# Altium PCB NB3000XN.PcbDoc (part 64 of 71)
Units mil, origin at the board's own origin, x right, y up, seen from the top; angles counter-clockwise.
Board outline 9527.56 x 6929.77 mil, 6 copper layers (Top Layer, GND+SHIELD, MidLayer1, MidLayer2, P2 - 3V3+5V0, Bottom Layer), stack 62.375 mil thick; 832 components, 1027 nets, 4655 pads, 4981 vias.
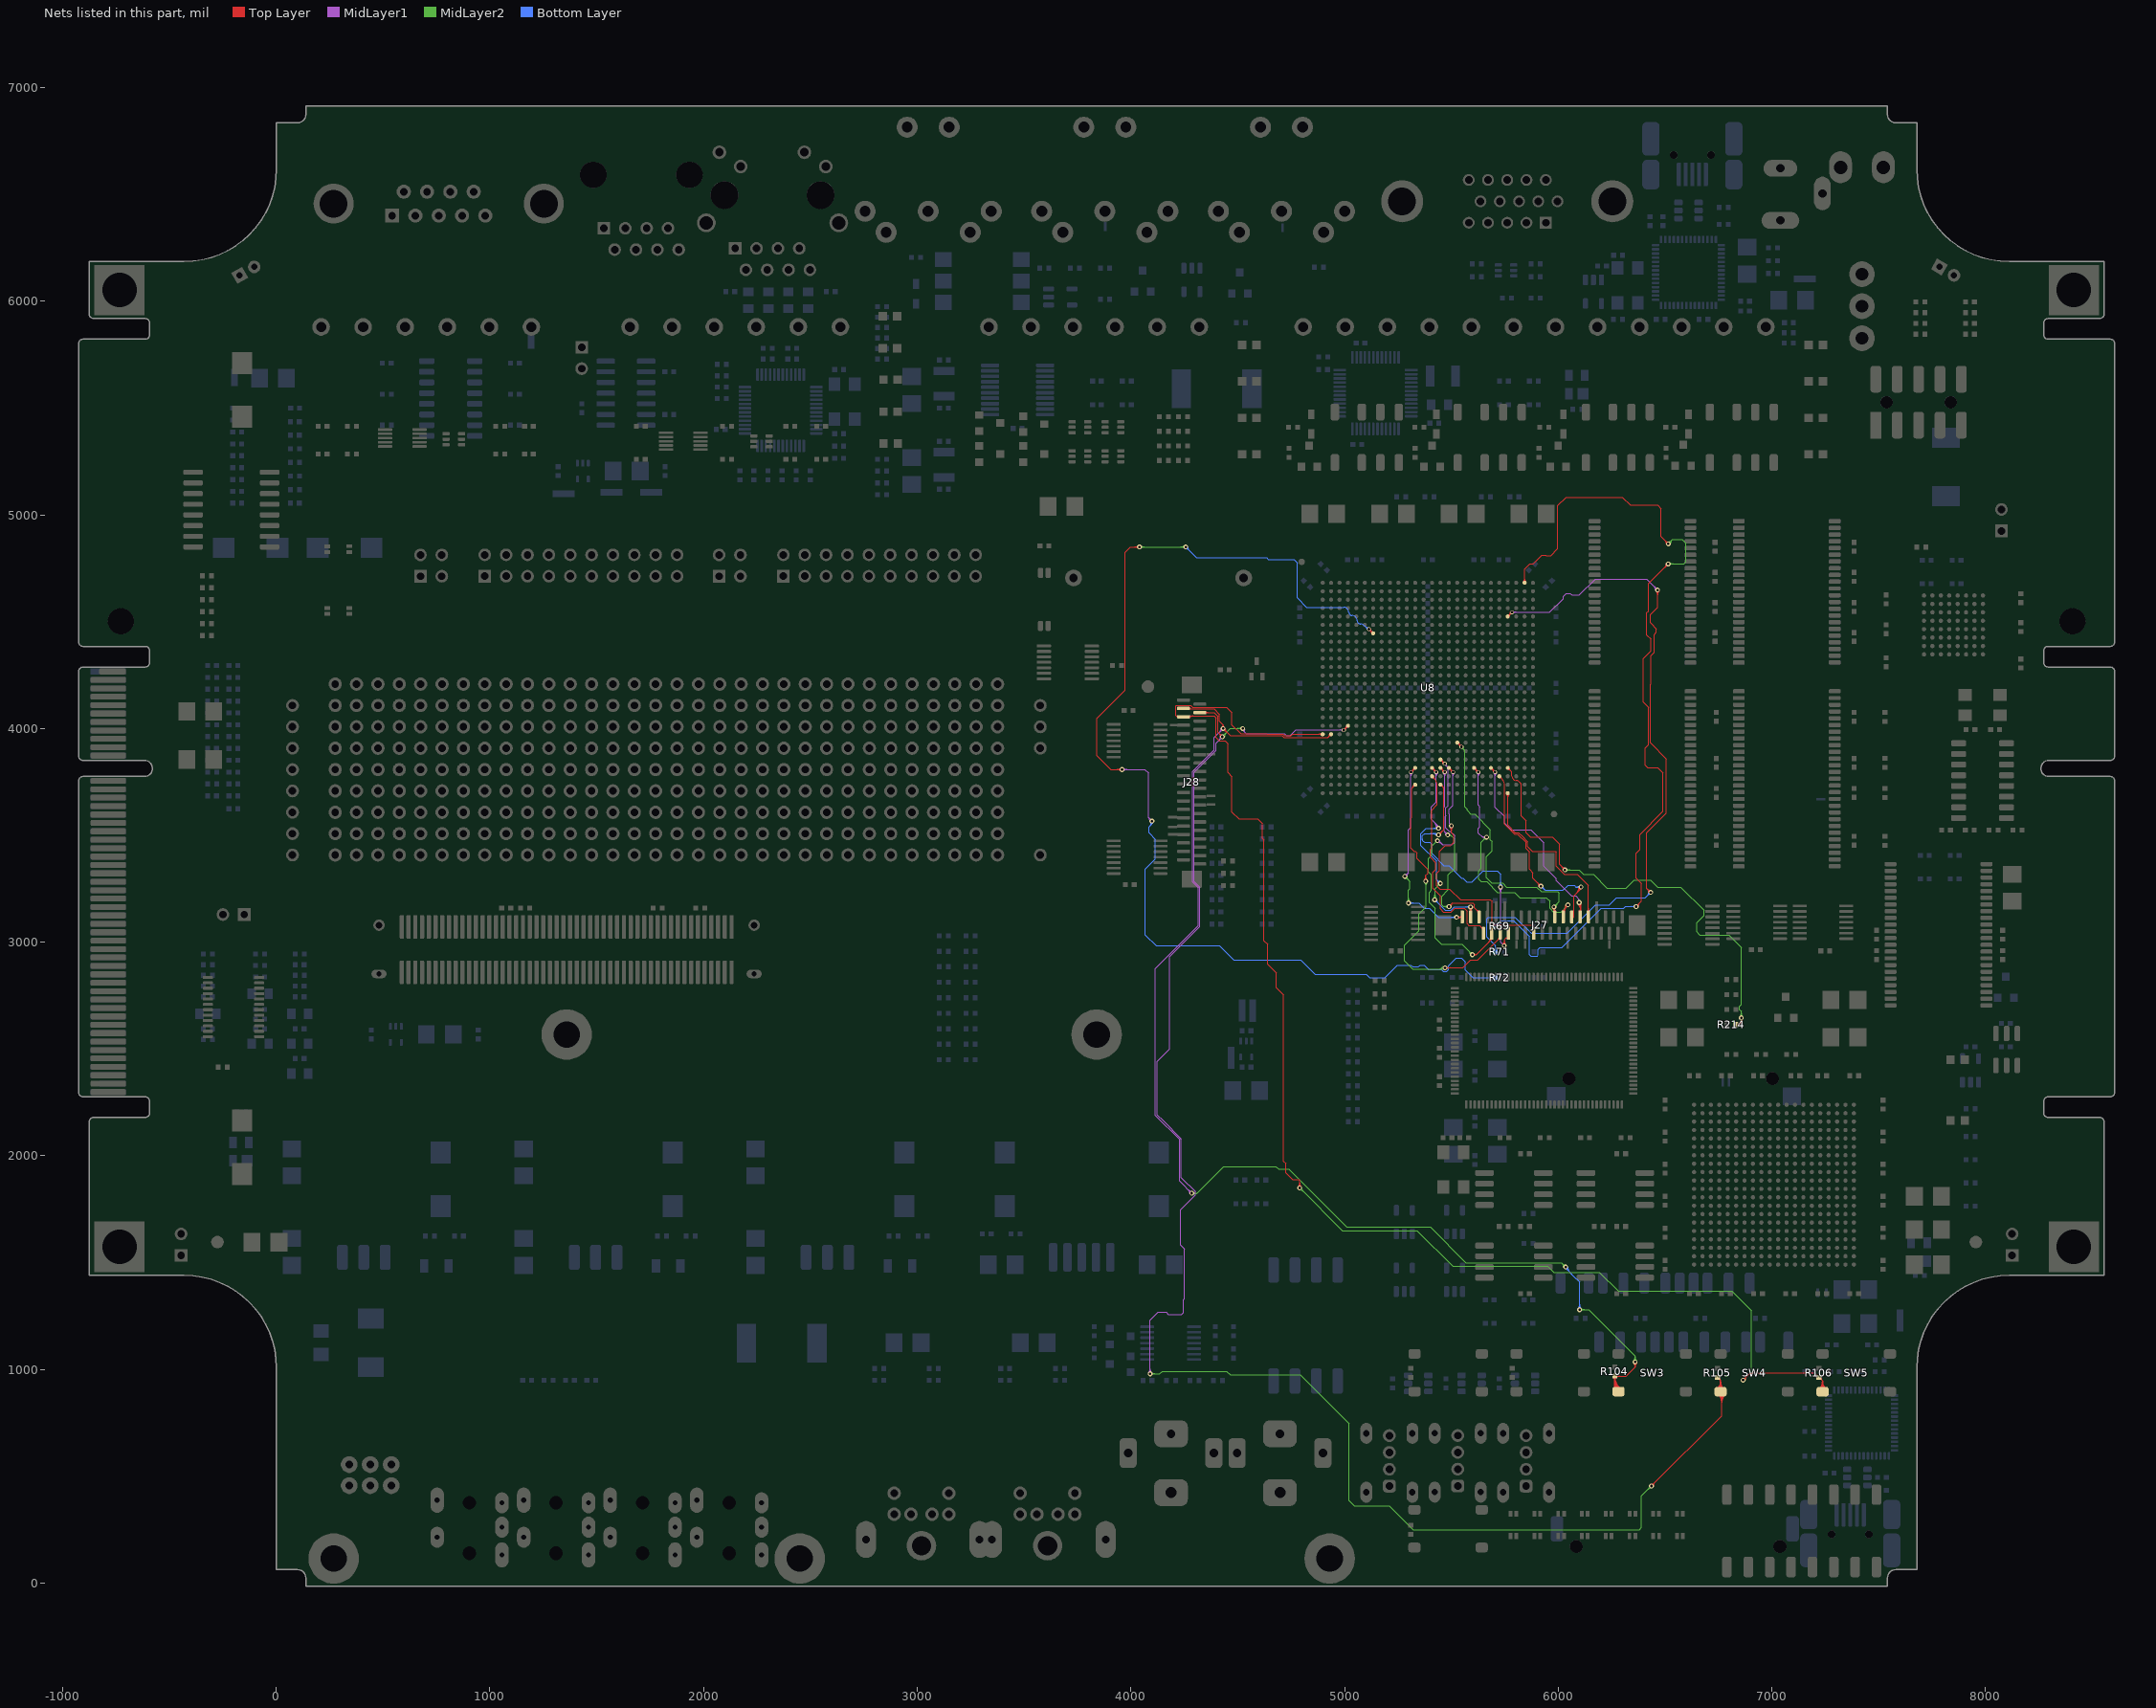
[diagram p68: the nets of this part, all layers, seen from the top]

## Via types
v1: diameter 23, hole 11.81, Top Layer to Bottom Layer, 3672 vias
v2: diameter 26, hole 11.81, Top Layer to Bottom Layer, 461 vias
v3: diameter 19, hole 11.81, Top Layer to Bottom Layer, tented both sides, 396 vias
v4: diameter 23.62, hole 11.81, Top Layer to Bottom Layer, 288 vias
v5: diameter 20, hole 11.81, Top Layer to Bottom Layer, 91 vias
v6: diameter 23, hole 11.81, Top Layer to Bottom Layer, tented both sides, 50 vias
v7: diameter 31, hole 11.81, Top Layer to Bottom Layer, 15 vias
v8: diameter 27.56, hole 11.81, Top Layer to Bottom Layer, tented both sides, 4 vias
v9: diameter 29, hole 11.81, Top Layer to Bottom Layer, 3 vias
v10: diameter 21, hole 11.81, Top Layer to Bottom Layer, 1 vias

## Nets (pads, with @x,y where several pads share a name; then routed paths per layer and width w, separated by ;. In a path a pad name is that pad's centre, name@x,y a point inside that pad or via, vN(x,y) a via of type N, cw(c..) or ccw(c..) an arc to the next point about the centre after c; other vN are vias at no path point) (continued)
SW#.D2: J28.3 R104.1 SW3.2 U8.W2 | length 7158.2
  Top Layer w4: J28.3@4246.61,4094.49 4248.52,4094.49 4251.3,4091.71 4390.19,4091.71 4415.19,4066.71 4415.19,4033.37 4431.86,4016.71 ; J28.3@4270.07,4095.81 ccw(c4279.98,4105.72) 4279.98,4091.71 ; J28.3@4272.89,4090.33 cw(c4276.21,4087.02) J28.3@4276.21,4091.71 ; J28.3@4272.89,4098.64 ccw(c4289.63,4115.38) 4289.63,4091.71 ; v1@4427.02,4008.22 ccw(c4421.99,4016.71) 4431.86,4016.71 ; v1@4431.86,3990.54 cw(c4431.86,3967.61) 4448.07,3983.82 cw(c4464.29,4000.04) v1@4441.36,4000.04 ; v1@4431.86,3994.54 cw(c4431.86,3981.26) 4441.25,3990.65 cw(c4450.64,4000.04) v1@4437.36,4000.04 ; v1@4436.7,4008.22 cw(c4441.73,4016.71) 4431.86,4016.71 ; U8.W2@4929.9,3973.46 cw(c4912.17,3973.46) 4924.71,3960.93 ; U8.W2@4937.24,3966.12 ccw(c4937.24,3948.4) 4924.71,3960.93 ; R104.1@6258.41,962.23 cw(c6242.5,946.32) 6265,946.32 cw(c6287.5,946.32) R104.1@6271.59,962.23 ; R104.1@6261.24,965.06 cw(c6252.16,955.98) 6265,955.98 cw(c6277.84,955.98) R104.1@6268.76,965.06 ; SW3.2@6262.02,911.31 ccw(c6254.84,918.49) SW3.2@6265,918.49 ; 6265,923.84 ccw(c6300.9,923.84) SW3.2@6276.85,897.18 ; 6265,932.83 ccw(c6309.01,932.83) SW3.2@6279.53,900.15 ; 6265,941.83 ccw(c6317.13,941.83) SW3.2@6282.21,903.12 ; 6265,950.82 ccw(c6325.24,950.82) SW3.2@6284.89,906.09 ; R104.1@6265,959.82 ccw(c6333.35,959.82) SW3.2@6287.57,909.06 ; R104.1@6269.25,965.06 cw(c6278.33,955.98) 6278.33,968.82 cw(c6278.33,981.66) R104.1@6269.25,972.58 ; R104.1@6272.08,962.23 cw(c6287.99,946.32) 6287.99,968.82 cw(c6287.99,991.32) R104.1@6272.08,975.41 ; SW3.2@6282.52,896.81 6265,914.33 R104.1@6265,968.82 ; SW3.2@6290.25,912.03 cw(c6341.47,968.81) R104.1@6265,968.82 ; v1@6353.19,1028.28 cw(c6336.97,1012.06) 6359.9,1012.06 cw(c6382.84,1012.06) v1@6366.62,1028.28 ; v1@6356.01,1031.11 cw(c6346.62,1021.72) 6359.9,1021.72 cw(c6373.18,1021.72) v1@6363.79,1031.11 ; v1(6359.9,1035) 6359.9,1010.93 6317.79,968.82 R104.1@6265,968.82 ; 4431.86,4016.71 v1(4431.86,4000.04) 4465.19,3966.71 4708.29,3966.71 4717.04,3957.96 ; 4717.04,3957.96 4796,3957.96 ; 4717.04,3957.96 4780,3957.96 4796,3957.96 ; 4796,3957.96 4855.26,3957.96 4860,3957.96 4870,3957.96 4917.53,3957.96 ccw(c4917.53,3968.11) 4924.71,3960.93
  MidLayer1 w4: v1@4275.5,1825 ccw(c4252.56,1825) 4268.78,1841.22 ccw(c4285,1857.43) v1@4285,1834.5 ; v1@4279.5,1825 ccw(c4266.22,1825) 4275.61,1834.39 ccw(c4285,1843.78) v1@4285,1830.5 ; v1(4285,1825) 4228,1882 4228,2076.69 4115.19,2189.5 4115.19,2877.67 4315.19,3077.67 4315.19,3255 4288.52,3281.67 4288.52,3798.71 4390.19,3900.37 4390.19,3958.37 v1(4431.86,4000.04) ; v1@4422.36,4000.04 cw(c4399.42,4000.04) 4415.64,3983.82 cw(c4431.86,3967.61) v1@4431.86,3990.54 ; v1@4426.36,4000.04 cw(c4413.08,4000.04) 4422.47,3990.65 cw(c4431.86,3981.26) v1@4431.86,3994.54
  MidLayer2 w4: v1@4285,1827.15 v1(4285,1825) 4310,1825 4435.04,1950.04 4678.29,1950.04 4691.15,1937.19 4739.36,1937.19 5009.84,1666.71 5401.5,1666.71 5568.17,1500.04 6014.96,1500.04 v4(6035,1480) ; v1@4288.89,1821.11 cw(c4298.28,1811.72) 4298.28,1825 cw(c4298.28,1838.28) v1@4288.89,1828.89 ; v1@4291.72,1818.28 cw(c4307.93,1802.06) 4307.93,1825 cw(c4307.93,1847.93) v1@4291.72,1831.72 ; v4@6025.19,1480 ccw(c6001.5,1480) 6018.25,1496.75 ccw(c6035,1513.5) v4@6035,1489.81 ; v4@6029.19,1480 ccw(c6015.16,1480) 6025.08,1489.92 ccw(c6035,1499.84) v4@6035,1485.81 ; v4(6100,1280) 6143.56,1280 6359.9,1063.66 v1(6359.9,1035) ; v4@6104.11,1275.89 cw(c6114.03,1265.97) 6114.03,1280 cw(c6114.03,1294.03) v4@6104.11,1284.11 ; v4@6106.94,1273.06 cw(c6123.69,1256.31) 6123.69,1280 cw(c6123.69,1303.69) v4@6106.94,1286.94 ; v1@6353.19,1041.72 ccw(c6336.97,1057.93) 6359.9,1057.93 ccw(c6382.84,1057.93) v1@6366.62,1041.72 ; v1@6356.01,1038.89 ccw(c6346.62,1048.28) 6359.9,1048.28 ccw(c6373.18,1048.28) v1@6363.79,1038.89
  Bottom Layer w4: v4@6035,1470.19 cw(c6035,1458.57) 6043.21,1466.79 ; v4(6035,1480) 6040,1480 6040,1470 6070,1440 ; v4@6036.81,1480 ccw(c6053.25,1480) 6041.63,1468.37 ; v4@6040.81,1480 ccw(c6066.91,1480) 6048.46,1461.54 ; v4@6044.81,1480 ccw(c6080.57,1480) 6055.28,1454.72 ; 6055,1455 6070,1440 ; v4@6093.06,1286.94 ccw(c6076.31,1303.69) 6100,1303.69 ccw(c6123.69,1303.69) v4@6106.94,1286.94 ; v4@6095.89,1284.11 ccw(c6085.97,1294.03) 6100,1294.03 ccw(c6114.03,1294.03) v4@6104.11,1284.11 ; v4(6100,1280) 6100,1410 6070,1440
SW#.D3: J28.4 R105.2 SW4.2 U8.V4 | length 9059.8
  Top Layer w4: J28.4@4331.86,4074.8 J28.4@4323.39,4074.8 4389.09,4074.8 4406.86,4057.04 4406.86,3983.37 v1(4428.52,3961.71) ; J28.4@4349.67,4070.65 cw(c4359.69,4060.62) 4359.69,4074.8 cw(c4359.69,4088.98) J28.4@4349.67,4078.96 ; v1@4419.02,3961.71 ccw(c4396.09,3961.71) 4412.31,3977.93 ccw(c4428.52,3994.14) v1@4428.52,3971.21 ; v1@4423.02,3961.71 ccw(c4409.75,3961.71) 4419.14,3971.1 ccw(c4428.52,3980.49) v1@4428.52,3967.21 ; v3(4996.3,3993.15) U8.V4@5015.98,4012.83 ; v3@5003.8,3993.15 cw(c5021.91,3993.15) 5009.1,4005.95 ; v3@5003.8,3993.15 cw(c5021.91,3993.15) 5009.1,4005.95 ; U8.V4@5008.48,4012.83 cw(c4990.38,4012.83) 5003.18,4000.03 cw(c5015.98,3987.23) U8.V4@5015.98,4005.33 ; U8.V4@5008.64,4012.83 cw(c4990.92,4012.83) 5003.45,4000.3 cw(c5015.98,3987.77) U8.V4@5015.98,4005.49 ; v1(6436.52,454.71) 6765.19,783.37 6765.19,891.25 SW4.2@6760.02,896.42 6760.02,948.8 R105.2@6745,963.82 ; v1@6436.52,460.21 ccw(c6436.52,473.49) 6445.91,464.1 ccw(c6455.3,454.71) v1@6442.02,454.71 ; v1@6436.52,464.21 ccw(c6436.52,487.14) 6452.74,470.93 ccw(c6468.96,454.71) v1@6446.02,454.71 ; SW4.2@6745.52,910.91 ccw(c6710.53,945.91) 6760.02,945.91 ccw(c6809.51,945.91) SW4.2@6774.52,910.91 ; R105.2@6745.69,958.5 cw(c6746.08,948.31) R105.2@6753.3,955.52 ; R105.2@6745.85,954.51 cw(c6746.56,935.83) 6759.77,949.05 cw(c6772.04,961.31) R105.2@6754.77,962.94 ; SW4.2@6748.35,908.08 ccw(c6720.19,936.25) 6760.02,936.25 ccw(c6799.85,936.25) SW4.2@6771.69,908.08 ; R105.2@6750.79,963.32 ccw(c6761.05,962.35) R105.2@6753.76,955.06 ; SW4.2@6751.18,905.26 ccw(c6729.84,926.59) 6760.02,926.59 ccw(c6790.2,926.59) SW4.2@6768.86,905.26 ; SW4.2@6751.52,881.92 cw(c6718.53,848.93) 6765.19,848.93 ; SW4.2@6754.35,884.75 cw(c6728.19,858.59) 6765.19,858.59 ; SW4.2@6757.18,887.58 cw(c6737.84,868.24) 6765.19,868.24 ; 6765.19,844.92 cw(c6817.51,844.92) SW4.2@6780.52,881.92 ; 6765.19,854.58 cw(c6807.86,854.58) SW4.2@6777.69,884.75 ; 6765.19,864.24 cw(c6798.2,864.24) SW4.2@6774.86,887.58 ; 6765.19,873.89 cw(c6788.54,873.89) SW4.2@6772.03,890.41 ; 5009.1,4005.95 cw(c4996.3,4018.76) 4996.3,4000.65 ccw(c4996.3,4018.76) 5009.1,4005.95
  MidLayer1 w4: v1@4083.28,986.72 ccw(c4067.06,1002.93) 4090,1002.93 ccw(c4112.93,1002.93) v1@4096.72,986.72 ; v1@4086.11,983.89 ccw(c4076.72,993.28) 4090,993.28 ccw(c4103.28,993.28) v1@4093.89,983.89 ; v1(4090,980) 4090,1230 4127.63,1267.63 4165,1267.63 4174.59,1258.04 4236.73,1258.04 4246,1267.31 4246,1327.31 4249.86,1331.17 4249.86,1565.02 4232.02,1582.85 4232.02,1747.28 4302.5,1817.75 4302.5,1832.25 4236,1898.75 4236,2080 4150,2166 4124.19,2191.81 4124.19,2442.98 4181.86,2500.65 4181.86,2933.02 4323.52,3074.69 4323.52,3257.98 4296.52,3284.98 4296.52,3795.39 4398.52,3897.39 4398.52,3931.71 v1(4428.52,3961.71) ; v1@4419.02,3961.71 cw(c4396.09,3961.71) 4412.31,3945.49 cw(c4428.52,3929.27) v1@4428.52,3952.21 ; v1@4423.02,3961.71 cw(c4409.75,3961.71) 4419.14,3952.32 cw(c4428.52,3942.93) v1@4428.52,3956.21 ; v1(4523.52,4000.04) 4523.52,3991.71 4540.19,3975.04 4718.52,3975.04 4726.86,3966.71 4746.06,3966.71 4772.5,3993.15 4860,3993.15 4870,3993.15 4918.62,3993.15 v3(4996.3,3993.15) ; v1@4524.92,3999.5 ccw(c4535.04,3995.55) 4527.36,3987.87 ; v1@4528.65,3998.04 ccw(c4541.28,3993.12) 4531.69,3983.54 ; v1@4532.38,3996.59 ccw(c4547.51,3990.69) 4536.02,3979.21 ; v3@4991,3987.85 ccw(c4978.19,3975.04) 4978.19,3993.15 ccw(c4978.19,4011.26) v3@4991,3998.45 ; v3@4991.11,3987.96 ccw(c4978.57,3975.42) 4978.57,3993.15 ccw(c4978.57,4010.88) v3@4991.11,3998.34
  MidLayer2 w4: v1(4090,980) 4135,980 4147.04,992.04 4447.96,992.04 4465,975 4793.69,975 5022,746.69 5022,386.11 5046.11,362 5208.94,362 5320.9,250.04 6200,250.04 ; v1@4093.89,976.11 cw(c4103.28,966.72) 4103.28,980 cw(c4103.28,993.28) v1@4093.89,983.89 ; v1@4096.72,973.28 cw(c4112.93,957.06) 4112.93,980 cw(c4112.93,1002.93) v1@4096.72,986.72 ; v1(4428.52,3961.71) 4466.86,4000.04 v1(4523.52,4000.04) ; v1@4428.52,3967.21 ccw(c4428.52,3980.49) 4437.91,3971.1 ccw(c4447.3,3961.71) v1@4434.02,3961.71 ; v1@4428.52,3971.21 ccw(c4428.52,3994.14) 4444.74,3977.93 ccw(c4460.96,3961.71) v1@4438.02,3961.71 ; v1@4516.81,3993.32 ccw(c4500.59,3977.11) 4500.59,4000.04 ccw(c4500.59,4022.98) v1@4516.81,4006.76 ; v1@4519.64,3996.15 ccw(c4510.25,3986.76) 4510.25,4000.04 ccw(c4510.25,4013.32) v1@4519.64,4003.93 ; 6200.33,249.71 6379.71,249.71 6390,260 6390,408.18 v1(6436.52,454.71) ; v1@6427.02,454.71 cw(c6404.09,454.71) 6420.31,438.49 cw(c6436.52,422.27) v1@6436.52,445.21 ; v1@6431.02,454.71 cw(c6417.75,454.71) 6427.14,445.32 cw(c6436.52,435.93) v1@6436.52,449.21
SW#.D4: J28.5 R106.1 SW5.2 U8.W1 | length 7278.1
  Top Layer w4: J28.5@4218.88,4053.38 ccw(c4216.52,4052.66) 4216.52,4055.12 ; J28.5@4218.88,4056.85 cw(c4216.52,4057.58) 4216.52,4055.12 ; J28.5@4270.07,4053.79 cw(c4281.13,4042.73) 4281.13,4058.37 ; J28.5@4272.89,4050.96 cw(c4290.78,4033.08) 4290.78,4058.37 ; v1@4783.47,1856.76 ccw(c4767.26,1872.98) 4790.19,1872.98 ccw(c4813.13,1872.98) v1@4796.91,1856.76 ; v1@4786.3,1853.93 ccw(c4776.91,1863.32) 4790.19,1863.32 ccw(c4803.47,1863.32) v1@4794.08,1853.93 ; v1(4790.19,1850.04) 4790.19,1885 4785.19,1890 4756.21,1890 4725,1921.21 4725,1965.03 4715.19,1974.84 4715.19,2753.02 4681.86,2786.35 4681.86,2855.39 4640.19,2897.06 4640.19,2989.81 4623.52,3006.48 4623.52,3478.02 4615.19,3486.36 4615.19,3555 4593.48,3576.71 4506.76,3576.71 4473.52,3609.94 4473.52,3775.65 4453.86,3795.32 4453.86,3928.04 4440.19,3941.71 4415.19,3941.71 4398.52,3958.37 4398.52,4050.04 4390.19,4058.37 4261.37,4058.37 J28.5@4256.86,4053.86 ; U8.W1@4892.57,3968.16 ccw(c4879.77,3955.36) 4879.77,3973.46 ccw(c4879.77,3991.57) U8.W1@4892.57,3978.77 ; U8.W1@4892.68,3968.27 ccw(c4880.15,3955.74) 4880.15,3973.46 ccw(c4880.15,3991.19) U8.W1@4892.68,3978.66 ; U8.W1@4897.87,3973.46 4870,3973.46 4860,3973.46 4756.76,3973.46 4750,3966.71 4719.61,3966.71 4711.31,3975 4635,3975 4515.19,3975.04 4473.52,4016.71 4473.52,4075.04 4448.52,4100.04 4288.86,4100.04 4280.52,4108.37 4213.52,4108.37 4210.52,4105.37 4210.52,4061.12 4216.52,4055.12 ; v1(6865.19,950.04) 6900.15,985 7198.82,985 R106.1@7220,963.82 ; v1@6865.19,955.54 ccw(c6865.19,968.82) 6874.58,959.43 ccw(c6883.97,950.04) v1@6870.69,950.04 ; v1@6865.19,959.54 ccw(c6865.19,982.48) 6881.41,966.26 ccw(c6897.63,950.04) v1@6874.69,950.04 ; 7203.25,980.57 cw(c7186.5,963.82) R106.1@7210.19,963.82 ; 7204.44,979.38 ccw(c7219.51,994.45) R106.1@7219.51,973.14 ; R106.1@7210.08,973.74 cw(c7200.16,963.82) R106.1@7214.19,963.82 ; R106.1@7211.27,972.55 ccw(c7219.51,980.79) R106.1@7219.51,969.14 ; R106.1@7215.19,963.82 R106.1@7220,963.82 ; R106.1@7220.49,954.5 cw(c7220.49,933.19) 7235.56,948.26 ; R106.1@7220.49,958.5 cw(c7220.49,946.85) R106.1@7228.73,955.09 ; SW5.2@7223.02,910.91 ccw(c7188.03,945.91) 7237.52,945.91 ccw(c7287.01,945.91) SW5.2@7252.02,910.91 ; R106.1@7225.81,963.82 ccw(c7239.84,963.82) R106.1@7229.92,953.9 ; SW5.2@7225.85,908.08 ccw(c7197.69,936.25) 7237.52,936.25 ccw(c7277.35,936.25) SW5.2@7249.19,908.08 ; SW5.2@7228.68,905.26 ccw(c7207.34,926.59) 7237.52,926.59 ccw(c7267.7,926.59) SW5.2@7246.36,905.26 ; R106.1@7229.81,963.82 ccw(c7253.5,963.82) 7236.75,947.07 ; SW5.2@7237.52,915 SW5.2@7237.52,896.42 7237.52,946.3 R106.1@7220,963.82 ; 4216.52,4055.12 J28.5@4246.61,4055.12 J28.5@4251.78,4055.12 ; J28.5@4251.78,4055.12 4256.86,4055.12 J28.5@4256.86,4053.86 ; J28.5@4251.78,4055.12 J28.5@4256.86,4050.04 ; J28.5@4256.86,4050.04 4255.04,4051.86 4255.04,4052.04 J28.5@4256.86,4053.86 ; J28.5@4256.86,4050.04 J28.5@4256.86,4053.86
  MidLayer2 w4: v1@4790.19,1840.54 cw(c4790.19,1817.61) 4806.41,1833.82 cw(c4822.63,1850.04) v1@4799.69,1850.04 ; v1@4790.19,1844.54 cw(c4790.19,1831.26) 4799.58,1840.65 cw(c4808.97,1850.04) v1@4795.69,1850.04 ; v1(4790.19,1850.04) 4990.19,1650.04 5340.19,1650.04 5506.86,1483.37 5951.63,1483.37 5980,1455 6193.56,1455 6281.52,1367.04 6812.96,1367.04 6905,1275 6905,989.85 v1(6865.19,950.04) ; v1@6865.19,955.54 ccw(c6865.19,968.82) 6874.58,959.43 ccw(c6883.97,950.04) v1@6870.69,950.04 ; v1@6865.19,959.54 ccw(c6865.19,982.48) 6881.41,966.26 ccw(c6897.63,950.04) v1@6874.69,950.04
TCK: R69.2 U8.A25 | length 4610.3
  Top Layer w4: U8.A25@5837.45,4687.43 ccw(c5824.65,4700.23) 5842.76,4700.23 ccw(c5860.86,4700.23) U8.A25@5848.06,4687.43 ; U8.A25@5837.56,4687.32 ccw(c5825.03,4699.85) 5842.76,4699.85 ccw(c5860.48,4699.85) U8.A25@5847.95,4687.32 ; U8.A25@5842.76,4682.13 5842.76,4710 5842.76,4720 5842.76,4746.65 5867.65,4771.54 5882.75,4771.54 5923.21,4812 5941.94,4812 5944.44,4809.5 5965.56,4809.5 5998.52,4842.46 5998.52,5044.71 6037.19,5083.37 6300.19,5083.37 6337.52,5046.04 6465.19,5046.04 6481.86,5029.37 6481.86,4898.37 v1(6515.52,4864.71) ; v1(6365.19,3166.71) 6390.19,3191.71 6390.19,3275.04 6365.19,3300.04 6365.19,3416.71 6381.86,3433.37 6381.86,3504.37 6490.19,3612.71 6490.19,3791.71 6465.19,3816.71 6418.86,3816.71 6406.86,3828.71 6406.86,3908.37 6423.52,3925.04 6423.52,4098.71 6398.52,4123.71 6398.52,4328.34 6433.52,4363.34 6433.52,4420.04 6415.19,4438.37 6415.19,4541.71 6423.52,4550.04 6423.52,4678.71 v1(6515.19,4770.37) ; v1@6365.19,3172.21 ccw(c6365.19,3185.49) 6374.58,3176.1 ccw(c6383.97,3166.71) v1@6370.69,3166.71 ; v1@6365.19,3176.21 ccw(c6365.19,3199.14) 6381.41,3182.93 ccw(c6397.63,3166.71) v1@6374.69,3166.71 ; v1@6505.69,4770.37 cw(c6482.76,4770.37) 6498.97,4754.16 cw(c6515.19,4737.94) v1@6515.19,4760.87 ; v1@6506.02,4864.71 ccw(c6483.09,4864.71) 6499.31,4880.93 ccw(c6515.52,4897.14) v1@6515.52,4874.21 ; v1@6509.69,4770.37 cw(c6496.41,4770.37) 6505.8,4760.99 cw(c6515.19,4751.6) v1@6515.19,4764.87 ; v1@6510.02,4864.71 ccw(c6496.75,4864.71) 6506.14,4874.1 ccw(c6515.52,4883.49) v1@6515.52,4870.21
  MidLayer2 w4: v1(6515.19,4770.37) 6588.52,4770.37 6598.52,4780.37 6598.52,4866.71 6580.52,4884.71 6535.52,4884.71 v1(6515.52,4864.71) ; v1@6515.52,4870.21 ccw(c6515.52,4883.49) 6524.91,4874.1 ccw(c6534.3,4864.71) v1@6521.02,4864.71 ; v1@6515.52,4874.21 ccw(c6515.52,4897.14) 6531.74,4880.93 ccw(c6547.96,4864.71) v1@6525.02,4864.71 ; v1@6519.08,4766.49 cw(c6528.47,4757.1) 6528.47,4770.37 cw(c6528.47,4783.65) v1@6519.08,4774.26 ; v1@6521.91,4763.66 cw(c6538.13,4747.44) 6538.13,4770.37 cw(c6538.13,4793.31) v1@6521.91,4777.09
  Bottom Layer w4: R69.2@5705.82,3075 5731.19,3100.37 5792.23,3100.37 5865,3027.6 5865,2941.9 5872.52,2934.37 5902.52,2934.37 5906.86,2938.71 5906.86,2966.71 5915.19,2975.04 6017.86,2975.04 6201.19,3158.37 6306.86,3158.37 6315.19,3166.71 v1(6365.19,3166.71) ; R69.2@5705.82,3080.81 ccw(c5705.82,3094.84) R69.2@5715.74,3084.92 ; R69.2@5705.82,3084.81 ccw(c5705.82,3108.5) 5722.57,3091.75 ; R69.2@5711.14,3075.49 cw(c5722.79,3075.49) R69.2@5714.55,3083.73 ; R69.2@5715.14,3075.49 cw(c5736.45,3075.49) 5721.38,3090.56 ; v1@6358.47,3159.99 ccw(c6342.26,3143.77) 6342.26,3166.71 ccw(c6342.26,3189.64) v1@6358.47,3173.43 ; v1@6361.3,3162.82 ccw(c6351.91,3153.43) 6351.91,3166.71 ccw(c6351.91,3179.99) v1@6361.3,3170.6
TDI: R72.2 U8.G7 | length 6027.5
  Top Layer w4: v1@3952.14,3801.66 ccw(c3935.92,3785.44) 3935.92,3808.37 ccw(c3935.92,3831.31) v1@3952.14,3815.09 ; v1@3954.97,3804.49 ccw(c3945.58,3795.1) 3945.58,3808.37 ccw(c3945.58,3821.65) v1@3954.97,3812.26 ; v1(3958.86,3808.37) 3905.52,3808.37 3840.19,3873.71 3840.19,4046.69 3973.52,4180.02 3973.52,4825.04 3998.52,4850.04 v1(4040.19,4850.04) ; v1@4033.47,4843.32 ccw(c4017.26,4827.11) 4017.26,4850.04 ccw(c4017.26,4872.98) v1@4033.47,4856.76 ; v1@4036.3,4846.15 ccw(c4026.91,4836.76) 4026.91,4850.04 ccw(c4026.91,4863.32) v1@4036.3,4853.93 ; v3(5114.41,4465.59) U8.G7@5134.09,4445.91 ; U8.G7@5126.59,4445.91 ccw(c5108.49,4445.91) 5121.29,4458.71 ccw(c5134.09,4471.51) U8.G7@5134.09,4453.41 ; U8.G7@5126.75,4445.91 ccw(c5109.03,4445.91) 5121.56,4458.44 ccw(c5134.09,4470.97) U8.G7@5134.09,4453.25 ; 5127.21,4452.79 ccw(c5114.41,4439.98) 5114.41,4458.09 cw(c5114.41,4439.98) 5127.21,4452.79 ; 5127.21,4452.79 cw(c5140.02,4465.59) 5121.91,4465.59 ccw(c5140.02,4465.59) 5127.21,4452.79
  MidLayer1 w4: v1(3958.86,3808.37) 4065.19,3808.37 4081.86,3791.71 4081.86,3583.37 v1(4098.52,3566.71) ; v1@3962.75,3804.49 cw(c3972.14,3795.1) 3972.14,3808.37 cw(c3972.14,3821.65) v1@3962.75,3812.26 ; v1@3965.57,3801.66 cw(c3981.79,3785.44) 3981.79,3808.37 cw(c3981.79,3831.31) v1@3965.57,3815.09 ; v1@4089.02,3566.71 ccw(c4066.09,3566.71) 4082.31,3582.93 ccw(c4098.52,3599.14) v1@4098.52,3576.21 ; v1@4093.02,3566.71 ccw(c4079.75,3566.71) 4089.14,3576.1 ccw(c4098.52,3585.49) v1@4098.52,3572.21
  MidLayer2 w4: v1(4040.19,4850.04) v1(4256.86,4850.04) ; v1@4044.08,4846.15 cw(c4053.47,4836.76) 4053.47,4850.04 cw(c4053.47,4863.32) v1@4044.08,4853.93 ; v1@4046.91,4843.32 cw(c4063.13,4827.11) 4063.13,4850.04 cw(c4063.13,4872.98) v1@4046.91,4856.76 ; v1@4250.14,4843.32 ccw(c4233.92,4827.11) 4233.92,4850.04 ccw(c4233.92,4872.98) v1@4250.14,4856.76 ; v1@4252.97,4846.15 ccw(c4243.58,4836.76) 4243.58,4850.04 ccw(c4243.58,4863.32) v1@4252.97,4853.93
  Bottom Layer w4: 4091.59,3546.59 ccw(c4084.78,3553.4) v1@4091.7,3560.1 ; 4094.47,3549.47 ccw(c4087.7,3556.23) v1@4094.57,3562.88 ; 4097.34,3552.34 ccw(c4090.62,3559.06) v1@4097.45,3565.66 ; v1(4098.52,3566.71) 4098.52,3553.52 4085,3540 4085,3511.56 4115.19,3481.37 4115.19,3388.71 4068.19,3341.71 4068.19,3033.35 4118.5,2983.04 4415.17,2983.04 4481.17,2917.04 4788,2917.04 4795.21,2917.04 4862.21,2850.04 5100.84,2850.04 5117.84,2833.04 5188.19,2833.04 5248.52,2893.37 5311.15,2893.37 5318.98,2885.54 5346.73,2885.54 5354.57,2893.37 5371.86,2893.37 5391.19,2874.04 5392.73,2872.5 5452.75,2872.5 5462.75,2862.5 5477.25,2862.5 5487.5,2872.75 5487.5,2889.02 5523.52,2925.04 5548.52,2925.04 5565.19,2908.37 5565.19,2870.73 5600.92,2835 R72.2@5705.82,2835 ; 4100.21,3555.21 ccw(c4093.54,3561.88) v1@4100.32,3568.45 ; v1@4256.86,4840.54 cw(c4256.86,4817.61) 4273.07,4833.82 cw(c4289.29,4850.04) v1@4266.36,4850.04 ; v1@4256.86,4844.54 cw(c4256.86,4831.26) 4266.25,4840.65 cw(c4275.64,4850.04) v1@4262.36,4850.04 ; v1(4256.86,4850.04) 4298.52,4808.37 4307.19,4799.71 4635.17,4799.71 4643.17,4791.71 4764,4791.71 4779,4776.71 4779,4611 4821.9,4568.1 4860,4568.1 4870,4568.1 4996.3,4568.1 cw(c4996.3,4544.33) 5020.07,4544.33 ccw(c5035.67,4544.33) 5035.67,4528.73 cw(c5035.67,4504.96) 5059.44,4504.96 ccw(c5075.04,4504.96) 5075.04,4489.36 cw(c5075.04,4465.59) 5091.85,4482.4 5099.58,4475.98 ; v3@5107.02,4464.29 ccw(c5089.19,4461.14) 5099.58,4475.98 ; v3@5113.11,4472.98 cw(c5109.96,4490.81) 5099.58,4475.98 ; R72.2@5699.23,2828.41 ccw(c5683.32,2812.5) 5683.32,2835 ccw(c5683.32,2857.5) R72.2@5699.23,2841.59 ; R72.2@5702.06,2831.24 ccw(c5692.98,2822.16) 5692.98,2835 ccw(c5692.98,2847.84) R72.2@5702.06,2838.76 ; R72.2@5705.82,2835 5705.82,2834.51 R72.2@5705.82,2835
TDO: R71.2 U8.E23 | length 3869.6
  Top Layer w4: U8.E23@5764.02,4524.65 v3(5783.7,4544.33) ; U8.E23@5764.02,4531.99 ccw(c5764.02,4549.71) 5776.55,4537.18 ccw(c5789.08,4524.65) U8.E23@5771.36,4524.65 ; U8.E23@5764.02,4532.15 ccw(c5764.02,4550.25) 5776.82,4537.45 ccw(c5789.62,4524.65) U8.E23@5771.52,4524.65 ; v1@6423.69,3233.37 ccw(c6400.76,3233.37) 6416.97,3249.59 ccw(c6433.19,3265.81) v1@6433.19,3242.87 ; v1@6427.69,3233.37 ccw(c6414.41,3233.37) 6423.8,3242.76 ccw(c6433.19,3252.15) v1@6433.19,3238.87 ; v1(6433.19,3233.37) 6415.19,3251.37 6415.19,3513.39 6506.86,3605.06 6506.86,3858.37 6431.86,3933.37 6431.86,4206.37 6433.86,4208.37 6433.86,4341.04 6449.52,4356.71 6449.52,4440 6459.52,4450 6459.52,4467.04 6431.86,4494.71 6431.86,4533.39 6465.19,4566.73 v1(6465.19,4648.71) ; v1@6458.47,4641.99 cw(c6442.26,4625.77) 6465.19,4625.77 cw(c6488.13,4625.77) v1@6471.91,4641.99 ; v1@6461.3,4644.82 cw(c6451.91,4635.43) 6465.19,4635.43 cw(c6478.47,4635.43) v1@6469.08,4644.82 ; 5770.9,4531.53 cw(c5783.7,4518.72) 5783.7,4536.83 ccw(c5783.7,4518.72) 5770.9,4531.53 ; 5770.9,4531.53 ccw(c5758.09,4544.33) 5776.2,4544.33 cw(c5758.09,4544.33) 5770.9,4531.53
  MidLayer1 w4: v3(5783.7,4544.33) 5861.38,4544.33 5910,4544.33 5920,4544.33 5924.74,4544.33 5959.48,4544.33 6023.52,4608.37 6023.52,4618.71 6038.19,4633.37 6056.86,4633.37 6065.19,4625.04 6098.52,4625.04 6173.52,4700.04 6413.86,4700.04 v1(6465.19,4648.71) ; v3@5788.89,4539.14 cw(c5801.43,4526.6) 5801.43,4544.33 cw(c5801.43,4562.06) v3@5788.89,4549.52 ; v1@6455.69,4648.71 ccw(c6432.76,4648.71) 6448.97,4664.93 ccw(c6465.19,4681.14) v1@6465.19,4658.21 ; v1@6459.69,4648.71 ccw(c6446.41,4648.71) 6455.8,4658.1 ccw(c6465.19,4667.49) v1@6465.19,4654.21 ; 5801.81,4544.33 cw(c5801.81,4562.44) 5789,4549.63 ccw(c5801.81,4562.44) 5801.81,4544.33 ; 5801.81,4544.33 ccw(c5801.81,4526.22) 5789,4539.03 cw(c5801.81,4526.22) 5801.81,4544.33
  Bottom Layer w4: R71.2@5699.23,2962.08 ccw(c5683.32,2977.99) 5705.82,2977.99 ccw(c5728.32,2977.99) R71.2@5712.41,2962.08 ; R71.2@5702.06,2959.25 ccw(c5692.98,2968.33) 5705.82,2968.33 ccw(c5718.66,2968.33) R71.2@5709.58,2959.25 ; R71.2@5705.82,2955 5705.82,2984.41 5665.19,3025.04 5665.19,3108.37 5673.52,3116.71 5798.52,3116.71 5873.52,3041.71 6041.88,3041.71 6175.17,3175 6225,3175 6240.19,3175.04 6273.52,3208.37 6408.19,3208.37 v1(6433.19,3233.37) ; v1@6423.69,3233.37 cw(c6400.76,3233.37) 6416.97,3217.16 cw(c6433.19,3200.94) v1@6433.19,3223.87 ; v1@6427.69,3233.37 cw(c6414.41,3233.37) 6423.8,3223.99 cw(c6433.19,3214.6) v1@6433.19,3227.87
TFT_IO.BL: R214.2 U8.AC23 | length 2455.9
  Top Layer w4: v1@6022.36,3338.71 ccw(c5999.42,3338.71) 6015.64,3354.93 ccw(c6031.86,3371.14) v1@6031.86,3348.21 ; v1@6026.36,3338.71 ccw(c6013.08,3338.71) 6022.47,3348.1 ccw(c6031.86,3357.49) v1@6031.86,3344.21 ; v1(6031.86,3338.71) 6006.86,3363.71 6006.86,3458.37 5973.52,3491.71 5917,3491.71 5873.29,3491.71 5869.84,3491.71 5849.02,3512.52 5849.02,3515.98 5849.02,3530 5849.02,3568.94 5827.25,3590.71 5827.25,3660 5827.25,3670 5827.25,3736.73 ccw(c5817.1,3736.73) 5824.28,3743.91 5824.27,3744.13 5816.36,3752.05 ccw(c5803.39,3737.24) 5803.39,3756.93 cw(c5803.39,3776.62) 5783.7,3776.61 5783.7,3788.06 ccw(c5764.02,3788.06) 5777.94,3801.97 5777.94,3802.06 5776.55,3803.45 ; R214.2@6831.18,2615 6831.18,2616.71 6848.52,2616.71 ; R214.2@6838.33,2621.47 ccw(c6848.52,2630) 6848.52,2616.71 ; R214.2@6839.45,2611.2 cw(c6848.52,2606.48) 6848.52,2616.71 ; v1@6850.67,2638.5 cw(c6839.13,2625.04) 6856.86,2625.04 ; v1@6853.28,2641.53 cw(c6846.59,2633.74) 6856.86,2633.74 cw(c6867.12,2633.74) v1@6860.44,2641.53 ; v1(6856.86,2645.71) 6856.86,2625.04 ; v1@6863.04,2638.5 ccw(c6874.58,2625.04) 6856.86,2625.04 ; 5776.55,3803.45 cw(c5789.08,3815.98) 5771.36,3815.98 ccw(c5789.08,3815.98) 5776.55,3803.45 ; 5776.55,3803.45 ccw(c5764.02,3790.92) 5764.02,3808.64 cw(c5764.02,3790.92) 5776.55,3803.45 ; 6848.52,2616.71 6856.86,2625.04
  MidLayer2 w4: v1@6031.86,3330.37 v1(6031.86,3338.71) 6097.54,3338.71 6119.54,3316.71 6166.19,3316.71 6229.1,3253.8 6318.95,3253.8 6356.86,3291.71 6431.86,3291.71 6465.19,3258.37 6573.52,3258.37 6681.86,3150.04 6681.86,3125.04 6648.52,3091.71 6648.52,3048.37 ; v1@6035.75,3334.82 cw(c6045.14,3325.43) 6045.14,3338.71 cw(c6045.14,3351.99) v1@6035.75,3342.6 ; v1@6038.57,3331.99 cw(c6054.79,3315.77) 6054.79,3338.71 cw(c6054.79,3361.64) v1@6038.57,3345.43 ; v1@6850.14,2652.43 ccw(c6833.92,2668.64) 6856.86,2668.64 ccw(c6879.79,2668.64) v1@6863.57,2652.43 ; v1@6852.97,2649.6 ccw(c6843.58,2658.99) 6856.86,2658.99 ccw(c6870.14,2658.99) v1@6860.75,2649.6 ; v1(6856.86,2645.71) 6856.86,2676.67 6848.52,2685 6848.52,2700.04 6856.86,2708.37 6856.86,2975.04 6798.52,3033.37 6663.52,3033.37 6656.86,3040.04 ; 6648.52,3048.37 6656.86,3040.04 ; 6648.52,3048.37 6656.86,3040.04
TFT_IO.CS: J27.22 U8.AC16 | length 1507.4
  Top Layer w4: U8.AC16@5488.43,3808.48 cw(c5488.43,3790.38) 5501.23,3803.18 cw(c5514.03,3815.98) U8.AC16@5495.93,3815.98 ; U8.AC16@5488.43,3808.64 cw(c5488.43,3790.92) 5500.96,3803.45 cw(c5513.49,3815.98) U8.AC16@5495.77,3815.98 ; U8.AC16@5488.43,3815.98 v3(5508.11,3796.3) ; v1@5493.28,3538.28 cw(c5476.7,3521.7) 5500.15,3521.7 ; v1@5496.11,3541.11 cw(c5486.36,3531.36) 5500.15,3531.36 ; v1(5500,3545) 5500.15,3545 5500.15,3511.87 5512.02,3500 5512.02,3467.79 5496.11,3451.87 5471.87,3451.87 5444.31,3424.31 5444.31,3335.33 5431.02,3322.04 5431.02,3263.98 5445.91,3249.09 5492.39,3249.09 5542.28,3199.21 5682.69,3199.21 5690.19,3191.71 5690.19,3089.04 5698.52,3080.71 5876.19,3080.71 5890.19,3066.71 5890.19,3063.73 5885.9,3063.73 J27.22@5885.89,3041.61 ; 5500.15,3522.43 cw(c5522.57,3522.43) v1@5506.72,3538.28 ; 5500.15,3532.08 cw(c5512.92,3532.08) v1@5503.89,3541.11 ; 5878.72,3078.18 cw(c5865.8,3065.25) J27.22@5884.02,3063.88 ; 5884.88,3072.01 cw(c5877.26,3064.39) J27.22@5888.01,3063.58 ; 5495.31,3809.1 cw(c5482.5,3796.3) 5500.61,3796.3 ccw(c5482.5,3796.3) 5495.31,3809.1 ; 5495.31,3809.1 ccw(c5508.11,3821.91) 5508.11,3803.8 cw(c5508.11,3821.91) 5495.31,3809.1
  MidLayer1 w4: 5489.5,3599.44 5489.5,3599.88 ; v1(5500,3545) 5500.15,3545 5490.5,3554.65 5490.5,3598.88 5489.5,3599.88 ; v3@5502.81,3791 cw(c5490,3778.19) 5508.11,3778.19 cw(c5526.22,3778.19) v3@5513.41,3791 ; v3@5502.92,3791.11 cw(c5490.38,3778.57) 5508.11,3778.57 cw(c5525.84,3778.57) v3@5513.3,3791.11 ; v3(5508.11,3796.3) 5508.11,3718.62 5508.11,3670 5508.11,3660 5508.11,3640.27 5489.5,3621.66 5489.5,3599.88
TFT_IO.DB0: J27.34 U8.AD14 | length 1037.3
  Top Layer w4: 5407.69,3454.96 5407.69,3440.46 5402,3434.77 5402,3398 5427.5,3372.5 5427.5,3360 5427.5,3346.6 5427.5,3341.14 5414,3327.64 5414,3320 5414,3252.21 5448.52,3217.69 5448.52,3156.37 5463.19,3141.71 5498.52,3141.71 5515.19,3158.37 5561.52,3158.37 5573.52,3146.37 5573.52,3086.04 5581.86,3077.71 5631.86,3077.71 5648.52,3061.04 5648.52,3050.04 5649.67,3050.04 J27.34@5649.67,3041.61 ; 5407.7,3440.47 5407.7,3618.89 5433.55,3644.73 5433.55,3660 5433.55,3670 5433.55,3736.73 ccw(c5394.87,3736.73) 5422.22,3764.08 ; U8.AD14@5409.69,3769.27 cw(c5409.69,3751.55) 5422.22,3764.08 ; U8.AD14@5417.03,3776.61 ccw(c5434.75,3776.61) 5422.22,3764.08 ; 5633.78,3075.78 ccw(c5648.72,3090.72) J27.34@5649.46,3069.61 ; 5640.28,3069.28 ccw(c5649.16,3078.16) J27.34@5649.6,3065.61 ; J27.34@5642.36,3067.2 cw(c5638.9,3063.74) J27.34@5643.8,3063.74
TFT_IO.DB1: J27.32 U8.AB15 | length 1707.5
  Top Layer w4: U8.AB15@5449.06,3847.85 cw(c5449.06,3829.75) 5461.86,3842.55 cw(c5474.66,3855.35) U8.AB15@5456.56,3855.35 ; U8.AB15@5449.06,3848.01 cw(c5449.06,3830.29) 5461.59,3842.82 cw(c5474.12,3855.35) U8.AB15@5456.4,3855.35 ; U8.AB15@5449.06,3855.35 v3(5468.74,3835.67) ; v1(5598.52,2941.71) 5616.19,2941.71 ; v1@5606.45,2936.47 cw(c5616.19,2930.03) 5616.19,2941.71 ; v1@5606.45,2946.95 ccw(c5616.19,2953.38) 5616.19,2941.71 ; 5675.53,3001.05 ccw(c5657.09,3019.49) J27.32@5683.17,3019.49 ; 5682.36,3007.87 ccw(c5670.74,3019.49) J27.32@5687.17,3019.49 ; J27.32@5689.04,3041.61 5689.04,3019.48 5689.04,3016.71 5689.19,3016.71 5690.19,3015.71 5616.19,2941.71 ; 5455.94,3848.47 cw(c5443.13,3835.67) 5461.24,3835.67 ccw(c5443.13,3835.67) 5455.94,3848.47 ; 5455.94,3848.47 ccw(c5468.74,3861.28) 5468.74,3843.17 cw(c5468.74,3861.28) 5455.94,3848.47
  MidLayer1 w4: v1@5435,3465.5 cw(c5435,3429.93) 5460.15,3455.08 ; v1@5435,3469.5 cw(c5435,3443.59) 5453.32,3461.91 ; v1@5435,3473.5 cw(c5435,3457.25) 5446.49,3468.74 ; v1(5435,3475) 5435,3476.55 5436.46,3478.01 5437.22,3478.01 5459.52,3455.71 5502.52,3455.71 5515.19,3468.37 5515.19,3498.31 5494,3519.5 5489.44,3519.5 5474.5,3534.44 5474.5,3591.81 5473.5,3592.81 5473.5,3628.29 5484.25,3639.04 5484.25,3660 5484.25,3670 5484.25,3718.62 5484.25,3812.16 ; v1@5444.5,3475 ccw(c5454.8,3475) 5447.52,3467.71 ; v3@5468.09,3828.2 cw(c5466.51,3810.16) 5480.38,3821.8 cw(c5494.25,3833.44) v3@5476.21,3835.02 ; 5480.13,3822.09 cw(c5470.2,3812.16) 5484.25,3812.16 ; 5484.25,3798.23 5484.25,3812.16
  MidLayer2 w4: v1(5435,3475) 5435,3476.55 5436.46,3478.01 5437.22,3478.01 5440.19,3475.04 5440.19,3473.37 5437.32,3470.5 5429.44,3470.5 5409.5,3450.56 5409.5,3409.5 5392.5,3392.5 5392.5,3329.36 5406.86,3315 5406.86,3243.71 5396.52,3233.37 5396.52,3185.37 5423.52,3158.37 5423.52,3020 5453.52,2990 5550.23,2990 v1(5598.52,2941.71) ; v1@5589.02,2941.71 ccw(c5566.09,2941.71) 5582.31,2957.93 ccw(c5598.52,2974.14) v1@5598.52,2951.21 ; v1@5593.02,2941.71 ccw(c5579.75,2941.71) 5589.14,2951.1 ccw(c5598.52,2960.49) v1@5598.52,2947.21
TFT_IO.DB2: J27.30 U8.AE12 | length 1752.5
  Top Layer w4: U8.AE12@5323.6,3737.24 cw(c5305.88,3737.24) 5318.41,3724.71 ; U8.AE12@5330.94,3729.9 ccw(c5330.94,3712.17) 5318.41,3724.71 ; v1@5373.28,3291.72 ccw(c5357.06,3307.93) 5380,3307.93 ccw(c5402.93,3307.93) v1@5386.72,3291.72 ; v1@5376.11,3288.89 ccw(c5366.72,3298.28) 5380,3298.28 ccw(c5393.28,3298.28) v1@5383.89,3288.89 ; v1@5381.86,3283.37 5380.23,3285 v1(5380,3285) 5380,3312.87 5390,3322.87 5390,3340.9 5340.19,3390.71 5340.19,3416.71 5331.86,3425.04 5325.86,3425.04 5309.19,3441.71 5309.19,3579 5315.19,3585 5315.44,3585.25 5315.44,3655.26 5315.44,3660 5315.44,3670 5315.44,3717.53 cw(c5325.59,3717.53) 5318.41,3724.71 ; v1(5470,2880) 5553.15,2880 5589.86,2916.71 5623.52,2916.71 5723.52,3016.71 5723.52,3033.37 5728.41,3033.37 J27.30@5728.41,3041.61 ; v1@5473.89,2876.11 cw(c5483.28,2866.72) 5483.28,2880 cw(c5483.28,2893.28) v1@5473.89,2883.89 ; v1@5476.72,2873.28 cw(c5492.93,2857.06) 5492.93,2880 cw(c5492.93,2902.93) v1@5476.72,2886.72 ; 5714.79,3007.97 cw(c5728.41,2994.35) J27.30@5728.41,3013.61 ; 5719.87,3013.06 ccw(c5713.44,3019.49) J27.30@5722.54,3019.49 ; J27.30@5721.62,3014.8 cw(c5728.41,3008) J27.30@5728.41,3017.61
  MidLayer2 w4: v1@5373.28,3278.28 cw(c5350.57,3255.57) 5382.69,3255.57 ; v1@5376.11,3281.11 cw(c5360.23,3265.23) 5382.69,3265.23 ; v1(5380,3285) 5382.69,3282.31 5382.69,3165 5348.52,3130.83 5348.52,3053.52 5281.02,2986.02 5281.02,2912.66 5319.48,2874.21 5464.21,2874.21 v1(5470,2880) ; 5382.69,3268.56 cw(c5396.44,3268.56) v1@5386.72,3278.28 ; 5433.08,2874.21 ccw(c5433.08,2916.92) v1@5463.28,2886.72 ; 5442.74,2874.21 ccw(c5442.74,2907.26) v1@5466.11,2883.89 ; 5452.4,2874.21 ccw(c5452.4,2897.6) v1@5468.94,2881.06
TFT_IO.DB3: J27.28 U8.AE15 | length 1621.6
  Top Layer w4: v1(5440.19,3502.71) 5464.52,3527.04 5464.52,3658.37 ; v1@5440.19,3508.21 ccw(c5440.19,3521.49) 5449.58,3512.1 ccw(c5458.97,3502.71) v1@5445.69,3502.71 ; v1@5440.19,3512.21 ccw(c5440.19,3535.14) 5456.41,3518.92 ccw(c5472.63,3502.71) v1@5449.69,3502.71 ; U8.AE15@5449.06,3729.9 cw(c5449.06,3712.17) 5461.59,3724.71 ; U8.AE15@5456.4,3737.24 ccw(c5474.12,3737.24) 5461.59,3724.71 ; v1@5740.81,2990.09 ccw(c5722.17,3008.72) 5748.52,3008.72 ; v1@5743.64,2987.26 ccw(c5731.83,2999.07) 5748.52,2999.07 ; v1(5747.52,2983.37) 5748.52,2984.37 5748.52,3011.15 5756.86,3019.48 ; 5748.52,3003.9 ccw(c5768.04,3003.9) v1@5754.24,2990.09 ; J27.28@5762.88,3016.24 ccw(c5756.86,3012.25) 5756.86,3019.48 ; J27.28@5762.88,3022.72 cw(c5756.86,3026.69) 5756.86,3019.48 ; J27.28@5767.78,3041.61 5767.78,3019.48 5756.86,3019.48 ; 5461.59,3724.71 cw(c5454.41,3717.53) 5464.56,3717.53 5464.56,3670 5464.56,3660 5464.56,3658.37 ; 5464.56,3658.37 5464.56,3655.26 5464.56,3658.37
  MidLayer1 w4: v1@5723.47,3251.66 cw(c5707.26,3235.44) 5730.19,3235.44 cw(c5753.13,3235.44) v1@5736.91,3251.66 ; v1@5726.3,3254.49 cw(c5716.91,3245.1) 5730.19,3245.1 cw(c5743.47,3245.1) v1@5734.08,3254.49 ; v1@5731.86,3256.71 v1(5730.19,3258.37) 5730.19,3000.71 5731.86,2999.04 ; 5731.86,2999.04 v1(5747.52,2983.37) 5731.86,2999.04
  Bottom Layer w4: 5403.01,3508.61 cw(c5403.01,3465.52) v1@5433.47,3495.99 ; 5412.66,3508.61 cw(c5412.66,3475.18) v1@5436.3,3498.82 ; 5422.32,3508.61 cw(c5422.32,3484.84) v1@5439.13,3501.65 ; v1(5440.19,3502.71) 5434.29,3508.61 5374.95,3508.61 5364.7,3498.36 5364.7,3483.86 5365.86,3482.71 5365.86,3475.04 5374.19,3466.71 5399.52,3466.71 5407.86,3458.37 5407.86,3415.71 5465.19,3358.37 5490.19,3358.37 5548.52,3300.04 5553.9,3300.04 5571.44,3282.5 5597.25,3282.5 5647.79,3333.04 5715.52,3333.04 5730.19,3318.37 v1(5730.19,3258.37) ; v1@5723.47,3265.09 ccw(c5707.26,3281.31) 5730.19,3281.31 ccw(c5753.13,3281.31) v1@5736.91,3265.09 ; v1@5726.3,3262.26 ccw(c5716.91,3271.65) 5730.19,3271.65 ccw(c5743.47,3271.65) v1@5734.08,3262.26
TFT_IO.DB4: J27.9 U8.AF23 | length 932.1
  Top Layer w4: U8.AF23@5758.71,3692.57 cw(c5745.91,3679.77) 5764.02,3679.77 cw(c5782.12,3679.77) U8.AF23@5769.32,3692.57 ; U8.AF23@5758.82,3692.68 cw(c5746.29,3680.15) 5764.02,3680.15 cw(c5781.74,3680.15) U8.AF23@5769.21,3692.68 ; U8.AF23@5764.02,3697.87 5764.02,3670 5764.02,3660 5764.02,3548.84 5799.28,3513.58 5813.97,3513.58 5831.45,3496.1 5856.86,3470.69 5856.86,3446.71 5878.52,3425.04 5988.52,3425.04 5990.19,3423.37 5990.19,3355.63 6029.11,3316.71 6090.19,3316.71 6140.19,3266.71 6140.19,3140.37 6141.79,3140.37 J27.9@6141.8,3118.39 ; J27.9@6137.64,3144.67 ccw(c6131.5,3150.81) 6140.19,3150.81 ; 6140.19,3148.92 ccw(c6150.2,3148.92) J27.9@6143.12,3141.84 ; 6140.19,3158.57 ccw(c6159.86,3158.57) J27.9@6145.95,3144.67
TFT_IO.DB5: J27.35 U8.AC15 | length 1299.4
  Top Layer w4: U8.AC15@5449.06,3808.48 cw(c5449.06,3790.38) 5461.86,3803.18 cw(c5474.66,3815.98) U8.AC15@5456.56,3815.98 ; U8.AC15@5449.06,3808.64 cw(c5449.06,3790.92) 5461.59,3803.45 cw(c5474.12,3815.98) U8.AC15@5456.4,3815.98 ; U8.AC15@5449.06,3815.98 v3(5468.74,3796.3) ; v1(5489.19,3166.71) 5505.86,3183.37 5535.48,3183.37 5535.65,3183.21 5600.69,3183.21 5608.86,3175.04 5608.86,3161.14 5629.99,3140.01 J27.35@5629.99,3118.39 ; v1@5489.19,3172.21 ccw(c5489.19,3185.49) 5498.58,3176.1 ccw(c5507.97,3166.71) v1@5494.69,3166.71 ; v1@5489.19,3176.21 ccw(c5489.19,3199.14) 5505.41,3182.93 ccw(c5521.63,3166.71) v1@5498.69,3166.71 ; 5619.11,3150.89 ccw(c5629.99,3161.77) J27.35@5629.99,3146.39 ; 5620.31,3149.69 cw(c5611.13,3140.51) J27.35@5624.11,3140.51 ; 5455.94,3809.1 cw(c5443.13,3796.3) 5461.24,3796.3 ccw(c5443.13,3796.3) 5455.94,3809.1 ; 5455.94,3809.1 ccw(c5468.74,3821.91) 5468.74,3803.8 cw(c5468.74,3821.91) 5455.94,3809.1
  MidLayer1 w4: v3@5463.44,3791 cw(c5450.63,3778.19) 5468.74,3778.19 cw(c5486.85,3778.19) v3@5474.04,3791 ; v3@5463.55,3791.11 cw(c5451.01,3778.57) 5468.74,3778.57 cw(c5486.47,3778.57) v3@5473.93,3791.11 ; v3(5468.74,3796.3) 5468.74,3670 5468.74,3660 5468.74,3634.85 5465.5,3631.61 5465.5,3589.5 5466.5,3588.5 5466.5,3518.8 v1(5483.3,3502) ; v1@5473.8,3502 ccw(c5450.86,3502) 5467.08,3518.22 ccw(c5483.3,3534.43) v1@5483.3,3511.5 ; v1@5477.8,3502 ccw(c5464.52,3502) 5473.91,3511.39 ccw(c5483.3,3520.78) v1@5483.3,3507.5
  MidLayer2 w4: v1@5482.47,3159.99 ccw(c5466.26,3143.77) 5466.26,3166.71 ccw(c5466.26,3189.64) v1@5482.47,3173.43 ; v1(5483.3,3502) 5496.88,3502 5516.02,3482.85 5516.02,3345.52 5485.19,3314.69 5485.19,3245.04 5455.86,3215.71 5455.86,3174.14 5463.29,3166.71 v1(5489.19,3166.71) ; v1@5485.3,3162.82 ccw(c5475.91,3153.43) 5475.91,3166.71 ccw(c5475.91,3179.99) v1@5485.3,3170.6
TFT_IO.DB6: J27.37 U8.AC14 | length 1697.7
  Top Layer w4: U8.AC14@5409.69,3808.48 cw(c5409.69,3790.38) 5422.49,3803.18 cw(c5435.29,3815.98) U8.AC14@5417.19,3815.98 ; U8.AC14@5409.69,3808.64 cw(c5409.69,3790.92) 5422.22,3803.45 cw(c5434.75,3815.98) U8.AC14@5417.03,3815.98 ; U8.AC14@5409.69,3815.98 v3(5429.37,3796.3) ; v1@5583.47,3157.99 cw(c5567.26,3141.77) 5590.19,3141.77 cw(c5613.13,3141.77) v1@5596.91,3157.99 ; v1@5586.3,3160.82 cw(c5576.91,3151.43) 5590.19,3151.43 cw(c5603.47,3151.43) v1@5594.08,3160.82 ; J27.37@5586.46,3144.67 ccw(c5577.46,3153.66) v1@5590.19,3153.66 ; v1@5590.19,3155.72 ccw(c5605.83,3155.72) J27.37@5594.77,3144.67 ; v1(5590.19,3164.71) 5590.19,3140.13 5590.62,3140.13 J27.37@5590.62,3118.39 ; 5416.57,3809.1 cw(c5403.76,3796.3) 5421.87,3796.3 ccw(c5403.76,3796.3) 5416.57,3809.1 ; 5416.57,3809.1 ccw(c5429.37,3821.91) 5429.37,3803.8 cw(c5429.37,3821.91) 5416.57,3809.1
  MidLayer1 w4: 5418.08,3563.82 cw(c5387.64,3533.37) v1@5430.69,3533.37 ; v3@5424.18,3791.11 cw(c5411.64,3778.57) 5429.37,3778.57 cw(c5447.1,3778.57) v3@5434.56,3791.11 ; 5424.91,3556.99 cw(c5401.29,3533.37) v1@5434.69,3533.37 ; v3(5429.37,3796.3) 5429.37,3718.62 5429.37,3670 5429.37,3660 5429.37,3655.26 5406.86,3632.75 5406.86,3575.04 5440.19,3541.71 v1(5440.19,3533.37) ; 5431.74,3550.16 cw(c5414.95,3533.37) v1@5438.69,3533.37 ; 5429.37,3778.19 cw(c5447.48,3778.19) 5434.67,3791 ccw(c5447.48,3778.19) 5429.37,3778.19 ; 5429.37,3778.19 ccw(c5411.26,3778.19) 5424.07,3791 cw(c5411.26,3778.19) 5429.37,3778.19
  MidLayer2 w4: v1@5415.47,3205.43 ccw(c5396.03,3224.86) 5423.52,3224.86 ; v1@5418.3,3202.6 ccw(c5405.69,3215.21) 5423.52,3215.21 ; v1(5422.19,3198.71) 5422.19,3207.04 5423.52,3208.37 5423.52,3250.04 v1(5448.52,3275.04) ; 5423.52,3218.42 ccw(c5441.9,3218.42) v1@5428.91,3205.43 ; v1@5439.02,3275.04 cw(c5416.09,3275.04) 5432.31,3258.82 cw(c5448.52,3242.61) v1@5448.52,3265.54 ; v1@5443.02,3275.04 cw(c5429.75,3275.04) 5439.14,3265.65 cw(c5448.52,3256.26) v1@5448.52,3269.54
  Bottom Layer w4: v1@5422.19,3189.21 cw(c5422.19,3166.27) 5438.41,3182.49 cw(c5454.63,3198.71) v1@5431.69,3198.71 ; v1@5422.19,3193.21 cw(c5422.19,3179.93) 5431.58,3189.32 cw(c5440.97,3198.71) v1@5427.69,3198.71 ; v1(5422.19,3198.71) 5471.86,3149.04 5498.52,3149.04 5514.19,3164.71 v1(5590.19,3164.71) ; v1@5433.47,3526.66 ccw(c5417.26,3510.44) 5417.26,3533.37 ccw(c5417.26,3556.31) v1@5433.47,3540.09 ; v1@5436.3,3529.49 ccw(c5426.91,3520.1) 5426.91,3533.37 ccw(c5426.91,3546.65) v1@5436.3,3537.26 ; v1@5439.02,3275.04 ccw(c5416.09,3275.04) 5432.31,3291.26 ccw(c5448.52,3307.48) v1@5448.52,3284.54 ; v1(5440.19,3533.37) 5382.86,3533.37 5357.86,3508.37 5357.86,3502.83 5356.7,3501.67 5356.7,3480.55 5357.86,3479.39 5357.86,3451.71 5430,3379.56 5430,3293.56 v1(5448.52,3275.04) ; v1@5443.02,3275.04 ccw(c5429.75,3275.04) 5439.14,3284.43 ccw(c5448.52,3293.82) v1@5448.52,3280.54 ; v1@5583.47,3157.99 ccw(c5567.26,3141.77) 5567.26,3164.71 ccw(c5567.26,3187.64) v1@5583.47,3171.43 ; v1@5586.3,3160.82 ccw(c5576.91,3151.43) 5576.91,3164.71 ccw(c5576.91,3177.99) v1@5586.3,3168.6
TFT_IO.DB7: J27.39 U8.AC12 | length 1486.9
  Top Layer w4: v3(5311.26,3796.3) U8.AC12@5330.94,3815.98 ; U8.AC12@5323.44,3815.98 cw(c5305.34,3815.98) 5318.14,3803.18 cw(c5330.94,3790.38) U8.AC12@5330.94,3808.48 ; U8.AC12@5323.6,3815.98 cw(c5305.88,3815.98) 5318.41,3803.45 cw(c5330.94,3790.92) U8.AC12@5330.94,3808.64 ; v1(5524.52,3116.71) 5549.57,3116.71 J27.39@5551.25,3118.39 ; v1@5528.41,3112.82 cw(c5537.8,3103.43) 5537.8,3116.71 cw(c5537.8,3129.99) v1@5528.41,3120.6 ; v1@5531.24,3109.99 cw(c5547.46,3093.77) 5547.46,3116.71 cw(c5547.46,3139.64) v1@5531.24,3123.43 ; v1@5533.01,3116.71 ccw(c5533.01,3136.62) J27.39@5547.09,3122.54 ; 5541.12,3116.71 cw(c5541.12,3108.26) J27.39@5547.09,3114.23 ; 5542.67,3116.71 ccw(c5542.67,3126.96) J27.39@5549.92,3119.71 ; 5324.06,3809.1 ccw(c5336.87,3796.3) 5318.76,3796.3 cw(c5336.87,3796.3) 5324.06,3809.1 ; 5324.06,3809.1 cw(c5311.26,3821.91) 5311.26,3803.8 ccw(c5311.26,3821.91) 5324.06,3809.1
  MidLayer1 w4: v1(5281.86,3308.37) 5298.52,3325.04 5298.52,3525.04 5311.26,3537.78 5311.26,3660 5311.26,3670 v3(5311.26,3796.3) ; v1@5281.86,3313.87 ccw(c5281.86,3327.15) 5291.25,3317.76 ccw(c5300.64,3308.37) v1@5287.36,3308.37 ; v1@5281.86,3317.87 ccw(c5281.86,3340.81) 5298.08,3324.59 ccw(c5314.29,3308.37) v1@5291.36,3308.37 ; v3@5305.96,3791 cw(c5293.15,3778.19) 5311.26,3778.19 cw(c5329.37,3778.19) v3@5316.56,3791 ; v3@5306.07,3791.11 cw(c5293.53,3778.57) 5311.26,3778.57 cw(c5328.99,3778.57) v3@5316.45,3791.11
  MidLayer2 w4: v1@5281.86,3298.87 cw(c5281.86,3275.94) 5298.07,3292.16 cw(c5314.29,3308.37) v1@5291.36,3308.37 ; v1@5281.86,3302.87 cw(c5281.86,3289.6) 5291.25,3298.99 cw(c5300.64,3308.37) v1@5287.36,3308.37 ; v1(5281.86,3308.37) 5306.19,3284.04 5306.19,3249.45 5299.52,3242.78 v1(5299.52,3183.37) ; v1@5292.81,3190.09 ccw(c5276.59,3206.31) 5299.52,3206.31 ccw(c5322.46,3206.31) v1@5306.24,3190.09 ; v1@5295.64,3187.26 ccw(c5286.25,3196.65) 5299.52,3196.65 ccw(c5312.8,3196.65) v1@5303.41,3187.26
  Bottom Layer w4: v1(5299.52,3183.37) 5348.52,3183.37 5373.52,3158.37 5398.52,3158.37 5440.19,3116.71 v1(5524.52,3116.71) ; v1@5303.41,3179.49 cw(c5312.8,3170.1) 5312.8,3183.37 cw(c5312.8,3196.65) v1@5303.41,3187.26 ; v1@5306.24,3176.66 cw(c5322.46,3160.44) 5322.46,3183.37 cw(c5322.46,3206.31) v1@5306.24,3190.09 ; v1@5517.81,3109.99 ccw(c5501.59,3093.77) 5501.59,3116.71 ccw(c5501.59,3139.64) v1@5517.81,3123.43 ; v1@5520.64,3112.82 ccw(c5511.25,3103.43) 5511.25,3116.71 ccw(c5511.25,3129.99) v1@5520.64,3120.6
TFT_IO.DB10: J27.11 U8.AC21 | length 1294.6
  Top Layer w4: U8.AC21@5685.28,3808.48 cw(c5685.28,3790.38) 5698.08,3803.18 cw(c5710.88,3815.98) U8.AC21@5692.78,3815.98 ; U8.AC21@5685.28,3808.64 cw(c5685.28,3790.92) 5697.81,3803.45 cw(c5710.34,3815.98) U8.AC21@5692.62,3815.98 ; U8.AC21@5685.28,3815.98 v3(5704.96,3796.3) ; v1@6091.81,3178.66 cw(c6055.47,3142.32) J27.11@6106.86,3142.32 ; v1@6094.64,3181.49 cw(c6065.13,3151.98) 6106.86,3151.98 ; v1@6097.46,3184.31 cw(c6074.79,3161.64) 6106.86,3161.64 ; J27.11@6098.27,3144.67 ccw(c6077.55,3165.39) 6106.86,3165.39 ; v1(6098.52,3185.37) 6106.86,3177.04 6106.86,3133.37 6102.43,3133.37 J27.11@6102.43,3118.39 ; v1@6100.29,3187.14 cw(c6084.44,3171.29) 6106.86,3171.29 ; J27.11@6101.1,3141.84 ccw(c6087.21,3155.73) 6106.86,3155.73 ; 5692.16,3809.1 cw(c5679.35,3796.3) 5697.46,3796.3 ccw(c5679.35,3796.3) 5692.16,3809.1 ; 5692.16,3809.1 ccw(c5704.96,3821.91) 5704.96,3803.8 cw(c5704.96,3821.91) 5692.16,3809.1
  MidLayer1 w4: v3@5699.77,3791.11 cw(c5687.23,3778.57) 5704.96,3778.57 cw(c5722.69,3778.57) v3@5710.15,3791.11 ; v3(5704.96,3796.3) 5704.96,3718.62 5704.96,3670 5704.96,3660 5704.96,3632.25 5748.52,3588.69 5748.52,3556.67 5780.15,3525.04 5872.17,3525.04 5872.21,3525 5931.86,3465.35 5931.86,3356 5990.19,3297.67 5990.19,3288.31 6061.79,3216.71 6081.86,3216.71 6098.52,3200.04 v1(6098.52,3185.37) ; 5704.96,3778.19 cw(c5723.07,3778.19) 5710.26,3791 ccw(c5723.07,3778.19) 5704.96,3778.19 ; 5704.96,3778.19 ccw(c5686.85,3778.19) 5699.66,3791 cw(c5686.85,3778.19) 5704.96,3778.19
TFT_IO.DB11: J27.13 U8.AD22 | length 1304
  Top Layer w4: v1@5910.02,3262.37 ccw(c5887.09,3262.37) 5903.31,3278.59 ccw(c5919.52,3294.81) v1@5919.52,3271.87 ; v1@5914.02,3262.37 ccw(c5900.75,3262.37) 5910.13,3271.76 ccw(c5919.52,3281.15) v1@5919.52,3267.87 ; v1(5919.52,3262.37) 5881.86,3300.04 5881.86,3325.04 5865.19,3341.71 5865.19,3423.37 5848.86,3439.71 5848.86,3467.37 5810.65,3505.58 5795.97,3505.58 5748.51,3553.04 5748.51,3567.72 5748.51,3595.18 5748.51,3660 5748.51,3670 5748.51,3736.73 ; J27.13@6063.06,3118.39 6063.06,3116.71 6071.86,3116.71 ; J27.13@6067.62,3114.69 cw(c6071.86,3111.26) 6071.86,3116.71 ; J27.13@6068.86,3119.28 ccw(c6071.86,3119.74) 6071.86,3116.71 ; 6084.75,3227.93 ccw(c6054.3,3258.37) v1@6097.36,3258.37 ; 6091.58,3234.76 ccw(c6067.96,3258.37) v1@6101.36,3258.37 ; 6098.4,3241.59 ccw(c6081.62,3258.37) v1@6105.36,3258.37 ; v1(6106.86,3258.37) 6106.86,3250.04 6073.52,3216.71 6073.52,3118.37 6071.86,3116.71 ; 5737.18,3764.08 cw(c5709.83,3736.73) 5748.51,3736.73 ; 5737.18,3764.08 cw(c5709.83,3736.73) 5748.51,3736.73 ; 5737.18,3764.08 cw(c5749.71,3776.61) 5731.99,3776.61 ccw(c5749.71,3776.61) 5737.18,3764.08 ; 5737.18,3764.08 ccw(c5724.65,3751.55) 5724.65,3769.27 cw(c5724.65,3751.55) 5737.18,3764.08
  Bottom Layer w4: v1@5919.52,3252.87 cw(c5919.52,3229.94) 5935.74,3246.16 cw(c5951.96,3262.37) v1@5929.02,3262.37 ; v1@5919.52,3256.87 cw(c5919.52,3243.6) 5928.91,3252.99 cw(c5938.3,3262.37) v1@5925.02,3262.37 ; v1(5919.52,3262.37) 5938.9,3243 6023,3243 6046.71,3266.71 6075,3266.71 6083.33,3258.37 v1(6106.86,3258.37) ; v1@6100.14,3251.66 ccw(c6083.92,3235.44) 6083.92,3258.37 ccw(c6083.92,3281.31) v1@6100.14,3265.09 ; v1@6102.97,3254.49 ccw(c6093.58,3245.1) 6093.58,3258.37 ccw(c6093.58,3271.65) v1@6102.97,3262.26
TFT_IO.DB12: J27.15 U8.AC19 | length 1589.6
  Top Layer w4: U8.AC19@5606.54,3808.48 cw(c5606.54,3790.38) 5619.34,3803.18 cw(c5632.14,3815.98) U8.AC19@5614.04,3815.98 ; U8.AC19@5606.54,3808.64 cw(c5606.54,3790.92) 5619.07,3803.45 cw(c5631.6,3815.98) U8.AC19@5613.88,3815.98 ; U8.AC19@5606.54,3815.98 v3(5626.22,3796.3) ; J27.15@6021.05,3145.76 ccw(c6018.89,3150.04) 6023.68,3150.04 ; J27.15@6021.56,3140.51 cw(c6039.02,3140.51) 6026.68,3152.86 ; J27.15@6023.69,3118.39 6023.68,3140.51 6023.68,3150.04 ; J27.15@6025.56,3140.51 cw(c6052.68,3140.51) 6033.5,3159.69 ; J27.15@6026.32,3145.76 cw(c6028.47,3150.04) 6023.68,3150.04 ; 6027.52,3153.7 ccw(c6006.18,3175.04) v1@6036.36,3175.04 ; J27.15@6029.56,3140.51 cw(c6066.34,3140.51) v1@6040.33,3166.52 ; 6034.35,3160.53 ccw(c6019.84,3175.04) v1@6040.36,3175.04 ; 6034.76,3160.94 cw(c6045.86,3149.85) v1@6045.86,3165.54 ; v1(6045.86,3175.04) 6045.86,3172.04 6023.86,3150.04 6023.68,3150.04 ; 5613.42,3809.1 cw(c5600.61,3796.3) 5618.72,3796.3 ccw(c5600.61,3796.3) 5613.42,3809.1 ; 5613.42,3809.1 ccw(c5626.22,3821.91) 5626.22,3803.8 cw(c5626.22,3821.91) 5613.42,3809.1
  MidLayer1 w4: v3@5620.92,3791 cw(c5608.11,3778.19) 5626.22,3778.19 cw(c5644.33,3778.19) v3@5631.52,3791 ; v3@5621.03,3791.11 cw(c5608.49,3778.57) 5626.22,3778.57 cw(c5643.95,3778.57) v3@5631.41,3791.11 ; v3(5626.22,3796.3) 5626.22,3718.62 5626.22,3670 5626.22,3660 5626.22,3641.41 5633.52,3634.1 5633.52,3540.04 5626.86,3533.37 5626.86,3510.71 5645.86,3491.71 ; v1@5657.67,3485.9 ccw(c5645.86,3476.79) 5645.86,3491.71 ; v1@5657.67,3497.51 cw(c5645.86,3506.63) 5645.86,3491.71 ; v1(5665.19,3491.71) 5645.86,3491.71
  MidLayer2 w4: 5646.13,3474.31 cw(c5665.19,3455.25) v1@5665.19,3482.21 ; 5650.15,3478.33 ccw(c5636.78,3491.71) v1@5655.69,3491.71 ; 5652.96,3481.14 cw(c5665.19,3468.91) v1@5665.19,3486.21 ; v1(5665.19,3491.71) 5663.52,3491.71 5640.19,3468.37 5640.19,3347.06 5627.5,3334.37 5627.5,3295.06 5639.19,3283.37 5666.19,3283.37 5716.19,3233.37 5795.19,3233.37 5819.86,3208.71 5944.52,3208.71 5961.52,3191.71 5961.52,3158.37 5978.19,3141.71 6012.52,3141.71 v1(6045.86,3175.04) ; v1@6036.36,3175.04 cw(c6013.42,3175.04) 6029.64,3158.82 cw(c6045.86,3142.61) v1@6045.86,3165.54 ; v1@6040.36,3175.04 cw(c6027.08,3175.04) 6036.47,3165.65 cw(c6045.86,3156.26) v1@6045.86,3169.54
TFT_IO.DB13: J27.17 U8.Y17 | length 1498.5
  Top Layer w4: U8.Y17@5527.8,3926.59 cw(c5527.8,3908.49) 5540.6,3921.29 cw(c5553.4,3934.09) U8.Y17@5535.3,3934.09 ; U8.Y17@5527.8,3926.75 cw(c5527.8,3909.03) 5540.33,3921.56 cw(c5552.86,3934.09) U8.Y17@5535.14,3934.09 ; U8.Y17@5527.8,3934.09 v3(5547.48,3914.41) ; v1@5973.47,3158.32 cw(c5953.23,3138.08) J27.17@5981.86,3138.08 ; v1@5976.3,3161.15 cw(c5962.89,3147.74) J27.17@5981.86,3147.74 ; J27.17@5980.16,3144.67 ccw(c5976.07,3148.75) 5981.86,3148.75 ; v1(5980.19,3165.04) 5981.86,3163.37 5981.86,3125.04 5984.32,3125.04 J27.17@5984.32,3118.39 ; J27.17@5981.86,3146.13 cw(c5999.1,3146.13) v1@5986.91,3158.32 ; 5981.86,3150.97 ccw(c5994.78,3150.97) J27.17@5985.64,3141.84 ; v1@5981.86,3160.63 ccw(c6004.44,3160.63) J27.17@5988.47,3144.67 ; 5534.68,3927.21 cw(c5521.87,3914.41) 5539.98,3914.41 ccw(c5521.87,3914.41) 5534.68,3927.21 ; 5534.68,3927.21 ccw(c5547.48,3940.02) 5547.48,3921.91 cw(c5547.48,3940.02) 5534.68,3927.21
  MidLayer2 w4: v3@5546.83,3906.94 cw(c5545.25,3888.9) 5559.12,3900.54 cw(c5572.99,3912.18) v3@5554.95,3913.76 ; 5558.87,3900.83 cw(c5548.94,3890.9) 5562.99,3890.9 ; 5562.99,3680.84 5562.99,3685 ; 5562.99,3876.97 5562.99,3890.9 ; v1(5980.19,3165.04) 6005,3189.85 6005,3229.56 5998.52,3236.04 5920.86,3236.04 5898.52,3258.37 5758.86,3258.37 5739.52,3277.71 5688.86,3277.71 5664.19,3302.38 5664.19,3401.35 5691.19,3428.35 5691.19,3463.37 5691.19,3471.73 5682.86,3480.06 5682.86,3526.71 5609.52,3600.04 5590.19,3600.04 5573.52,3616.71 5573.52,3622 5562.99,3632.54 5562.99,3660 5562.99,3670 5562.99,3685 ; v1@5980.19,3170.54 ccw(c5980.19,3183.82) 5989.58,3174.43 ccw(c5998.97,3165.04) v1@5985.69,3165.04 ; v1@5980.19,3174.54 ccw(c5980.19,3197.48) 5996.41,3181.26 ccw(c6012.63,3165.04) v1@5989.69,3165.04 ; 5562.99,3685 5562.99,3797.36 5562.99,3890.9